# Altium PCB PCB1.PcbDoc
Units mm, origin at the board's own origin, x right, y up, seen from the top; angles counter-clockwise.
Board outline 86.11 x 74.3 mm, 2 copper layers (Top Layer, Bottom Layer); 15 components, 18 nets, 78 pads, 0 vias.
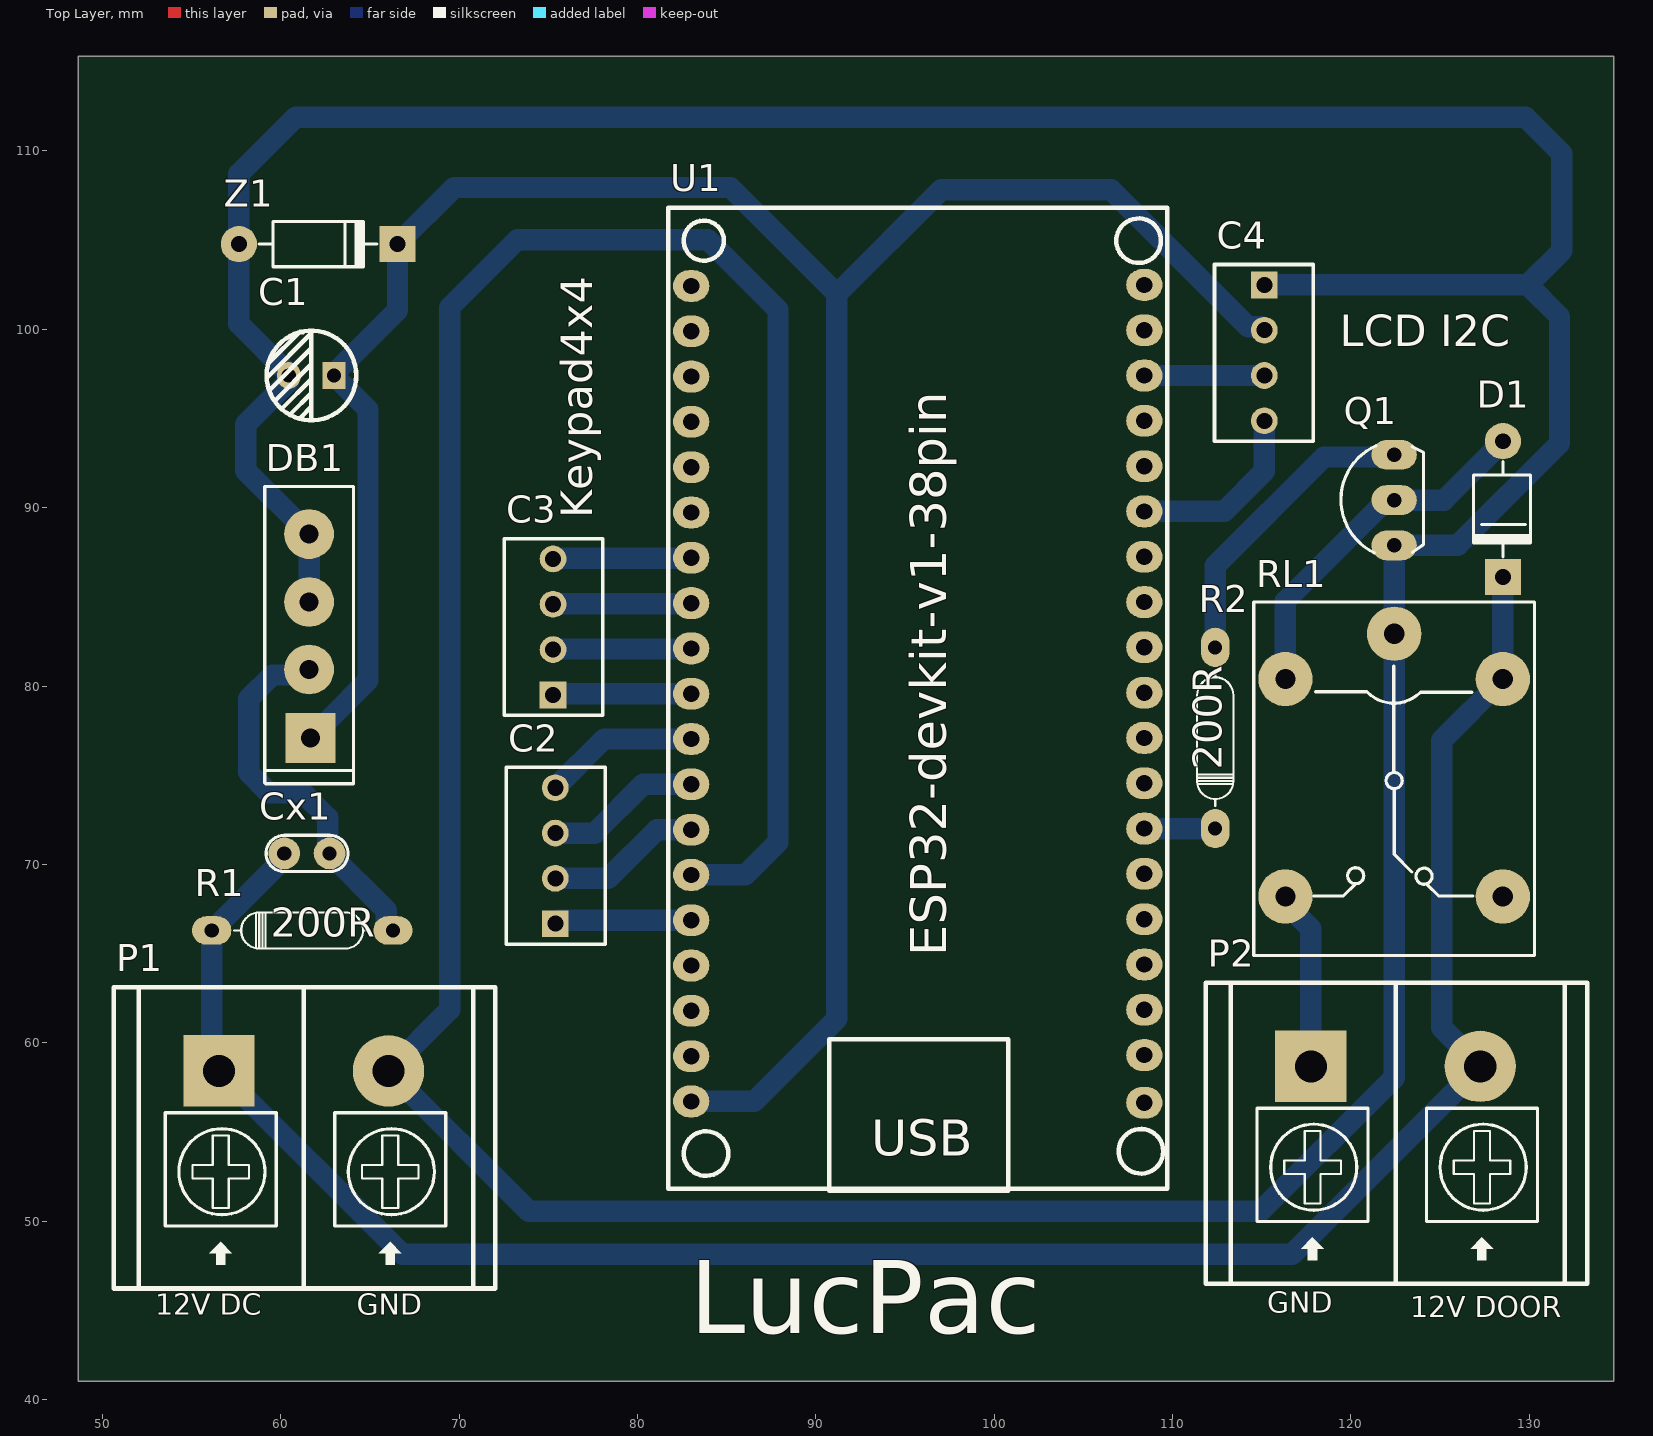
[diagram p0: Top Layer view]
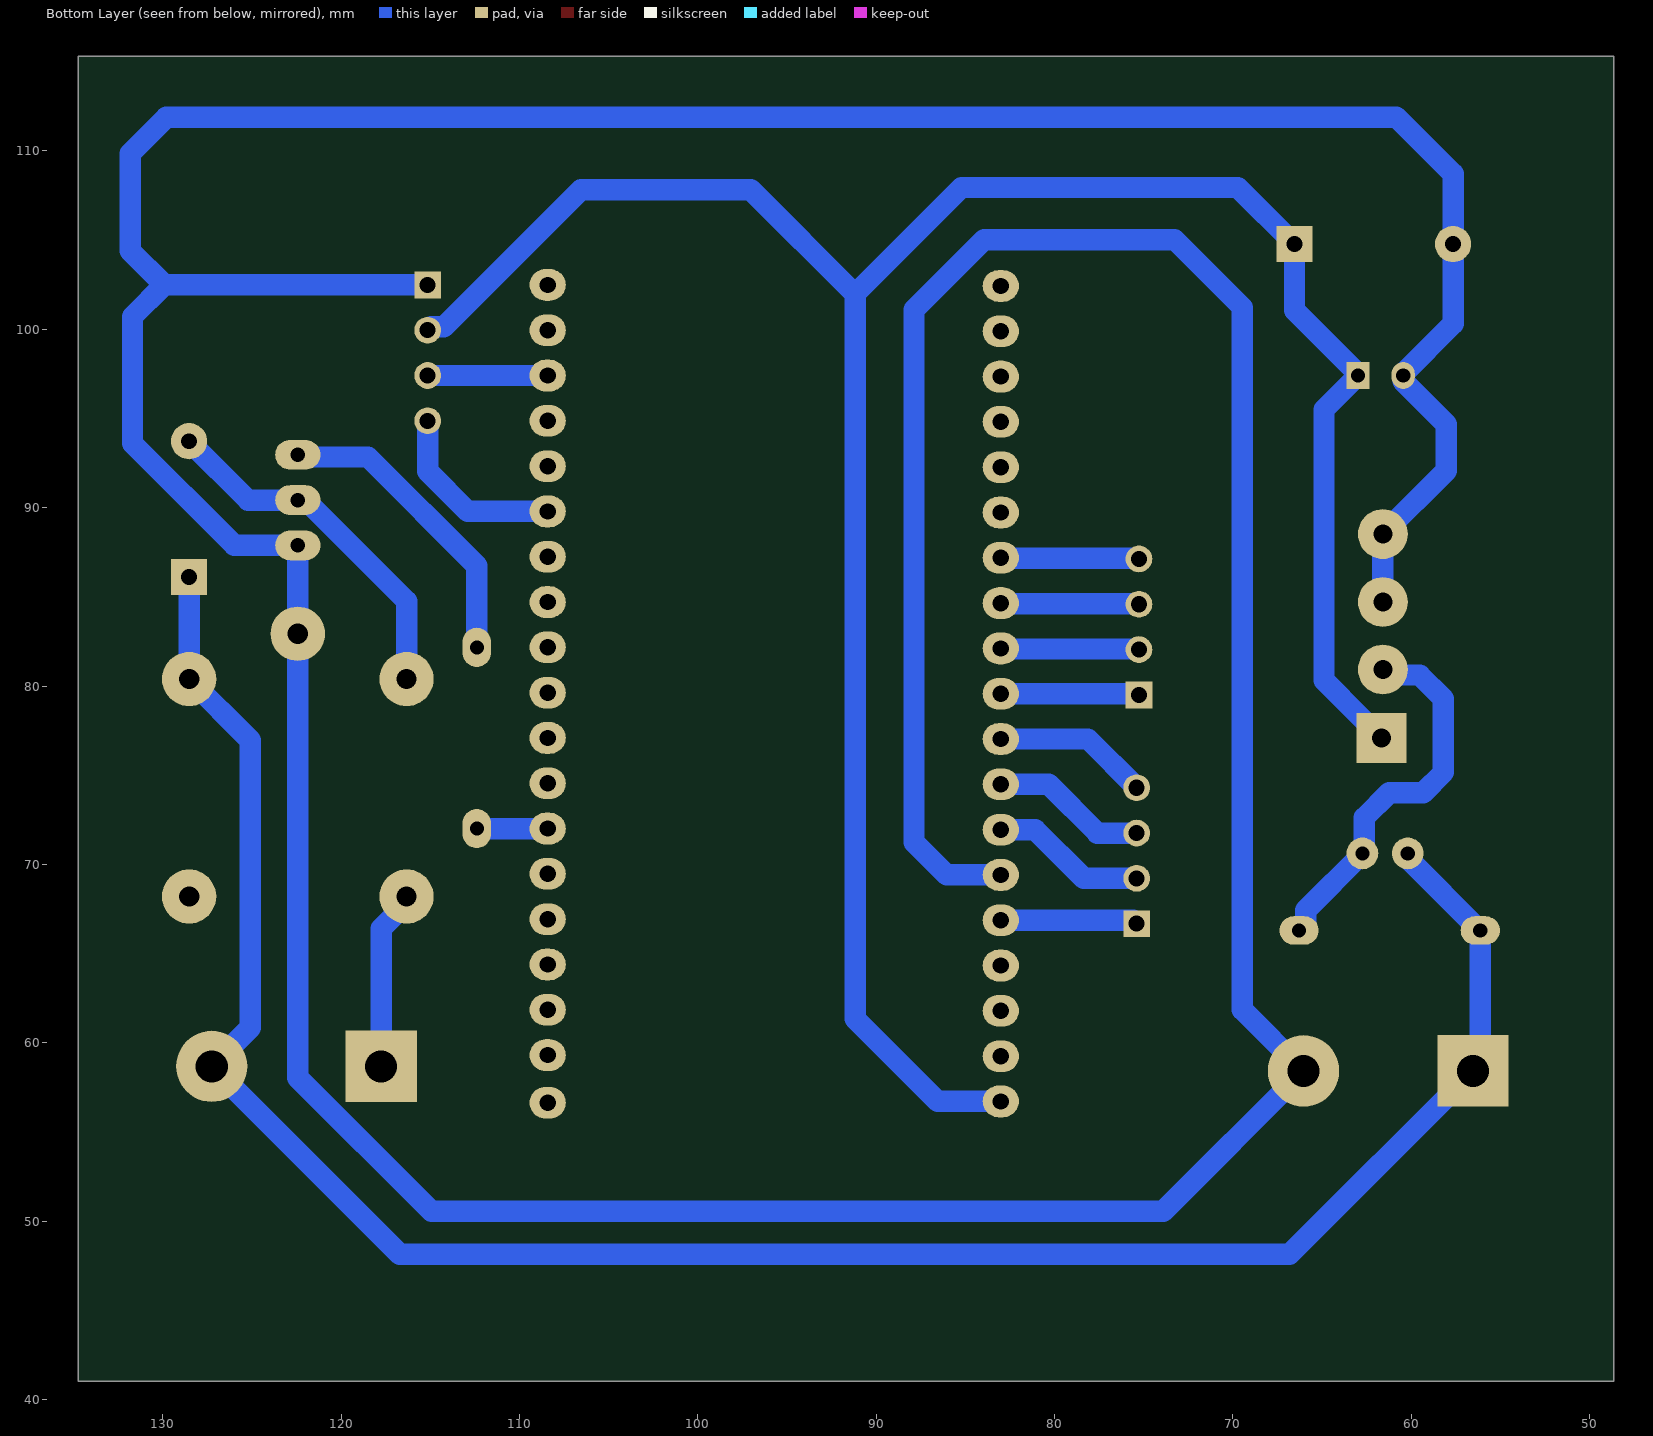
[diagram p1: Bottom Layer view, seen from below]
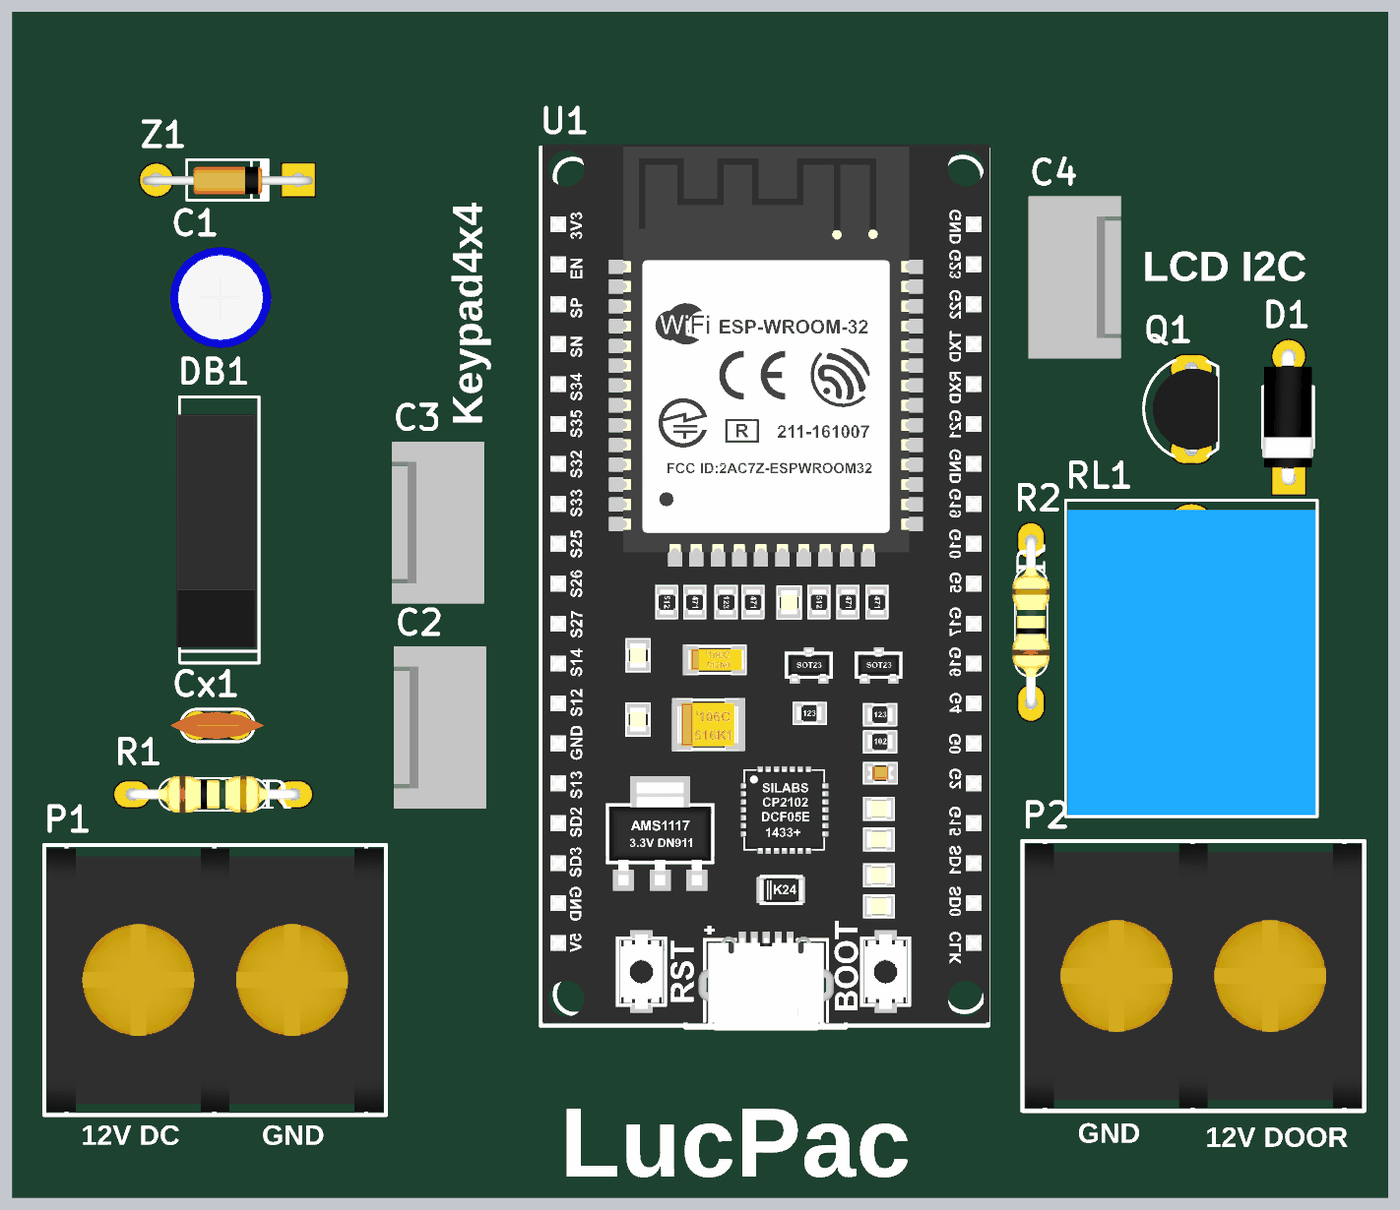
[diagram p2: 3D render of the assembled board from above, using the file's embedded part models]

## Layer stack, top to bottom
Top Solder: solder mask 0.0102, Solder Resist, Dk 3.5
Top Layer: signal copper 0.0356
Dielectric 1: dielectric 0.32, FR-4, Dk 4.8
Bottom Layer: signal copper 0.0356
Bottom Solder: solder mask 0.0102, Solder Resist, Dk 3.5

## Board outline
48.641,41.021 134.747,41.021 134.747,115.316 48.641,115.316

## Design rules (kind name [scope] priority, off if disabled: settings)
Clearance [All] p1: gap=0.31 ignorepadtopadclearanceinfootprint=FALSE
PolygonConnect [All] p1: connectstyle=Relief reliefconductorwidth=0.254 reliefentries=4 polygonreliefangle="90 Angle" airgapwidth=0.254
RoutingVias [All] p1: holewidth=0.711 width=1.27 viastyle="Through Hole" minholewidth=0.711 minwidth=1.27 maxholewidth=0.711 maxwidth=1.27
SilkToSilkClearance [All] p1: silktosilkclearance=0
SilkToSolderMaskClearance [IsPad] p1: minsilkscreentomaskgap=0 clearancetoexposedcopper=TRUE
SolderMaskExpansion [All] p1: expansion=0.102 istentingtop=FALSE
Width [All] p1: maxlimit=5 minlimit=0.254 preferedwidth=0.5
28 further rules are at their usual default settings.

## Components (designator, comment, footprint, x,y, rotation, side; value= is the part's Value field where it differs from the comment)
C1 "100uF" "tu hoa 5mm" 61.722,97.409 r180 top
C2 "Header4" HDR4 75.397,66.675 r90 top
C3 "Header4" HDR4 75.27,79.502 r90 top
C4 "Header4" HDR4 115.148,102.489 r270 top
Cx1 "1uF" CN1 61.468,70.612 r0 top value=33pF
D1 "100v" "DIODE 1A" 128.524,94.996 r90 top
DB1 "Diode Brideg" "CAU 1A" 61.62,77.089 r90 top value="Cau 1A"
P1 "HB9500-2P" HB9500-2P 56.54,58.42 r0 top
P2 "HB9500-2P" HB9500-2P 117.754,58.674 r0 top
Q1 "C1815" TO92 122.428,90.424 r90 top value=C9014
R1 "100K" "DIEN TRO 1/4 W" 56.134,66.294 r0 top value=R
R2 "510" "DIEN TRO 1/4 W" 112.395,72.009 r90 top value=R
RL1 "Relay 10A/12V" "RELAY 5" 122.428,74.676 r270 top value="Relay SPDT, 10A, 12V"
U1 "ESP32-DEVKI-V1.0-PIN38" ESP32-DEVKIT-V1.0-38PIN 95.717,79.248 r0 top
Z1 "5.1V" D1A 57.658,104.775 r180 top

## Footprints (in the part's own frame and the unit in brackets; to place one, negate y for a bottom-side part, rotate by r counter-clockwise, add the part's x,y. Pads: shape width x height; smd on the part's side, far side on the other; paste and mask are expansions set on the pad)
"CAU 1A" [mil] "CAU 1A DET"
  rect 110x110 hole 42: 1(0,-2)
  round 110 hole 42: 2(151,1) 3(300,1) 4(450,1)
  silkscreen extent -101,-97 555,99, body extent -62,-90 512,107, height 453
CN1 [mil]
  round 70 hole 31: 1(-50,0) 2(50,0)
  silkscreen extent -90,-40 91,40, body extent -115,-33 115,33, height 265
D1A [mil] "Diode 1A, W 100mil, L 350mil"
  round 80 hole 35: 1(0,0)
  rect 80x80 hole 35: 2(-350,0)
  silkscreen extent -305,-50 -45,50, body extent -386,-33 34,36, height 84
"DIEN TRO 1/4 W" [mm]
  oval 2.2x1.6 hole 0.787: 1(0,0) 2(10.16,0)
  silkscreen extent 1.26,-1.02 8.88,1.02, body extent -0.3,-1.16 10.46,1.16, height 2.93
"DIODE 1A" [mil] "Diode 1A"
  round 80 hole 35: 1(-50,0)
  rect 80x80 hole 35: 2(-350,0)
  silkscreen extent -305,-61 -95,65, body extent -366,-61 -34,65, height 122
ESP32-DEVKIT-V1.0-38PIN [mil] "DEVKIT 38 PIN"
  oval 80x70 hole 36: 1(-500,912.59) 2(-500,812.59) 3(-500,712.59) 4(-500,612.59) 5(-500,512.59) 6(-500,412.59) 7(-500,312.59) 8(-500,212.59) 9(-500,112.59) 10(-500,12.59) 11(-500,-87.41) 12(-500,-187.41) 13(-500,-287.41) 14(-500,-387.41) 15(-500,-487.41) 16(-500,-587.41) 17(-500,-687.41) 18(-500,-787.41) 19(-500,-887.41) 20(500,-890.09) 21(500,-785.09) 22(500,-685.09) 23(500,-585.09) 24(500,-485.09) 25(500,-385.09) 26(500,-285.09) 27(500,-185.09) 28(500,-85.09) 29(500,14.91) 30(500,114.91) 31(500,214.91) 32(500,314.91) 33(500,414.91) 34(500,514.91) 35(500,614.91) 36(500,714.91) 37(500,814.91) 38(500,914.91)
  silkscreen extent -551,-1085 551,1085, body extent -547,-1092 555,1092, height 269
HB9500-2P [mm]
  rect 4x4 hole 1.8: 1(0,0)
  round 4 hole 1.8: 2(9.5,0)
  silkscreen extent -5.9,-12.2 15.49,4.7, body extent -5.72,-12 15.32,4.5, height 18.51
HDR4 [mm] "Connector; Header; 4 Position"
  rect 1.5x1.5 hole 0.9: 1(0,0)
  round 1.5 hole 0.9: 2(2.54,0) 3(5.08,0) 4(7.62,0)
  silkscreen extent -1.14,-2.79 8.76,2.74, body extent -1.27,-2.92 8.89,2.88, height 11.72
"RELAY 5" [mil] "Reley DPDT, 8 pin, 1A, W400mil, L800mil,H 300mil"
  round 120 hole 45: 1(-325,0) 2(255,240) 3(255,-240) 4(-225,-240) 5(-225,240)
  silkscreen extent -395,-310 385,310, body extent -371,-304 381,306, height 602
TO92 [mil] "TO-92"
  oval 66x100 hole 32: 1(-100,0) 2(0,0) 3(100,0)
  silkscreen extent -117,-65 120,118, body extent -109,-66 109,95, height 245
"tu hoa 5mm" [mm]
  rect 1.3x1.5 hole 0.8: 1(-1.27,0)
  oval 1.3x1.5 hole 0.8: 2(1.27,0)
  silkscreen extent -2.51,-2.51 2.51,2.51, body extent -3.12,-3.18 3.23,3.18, height 14.55

## Part data
C1: library part "Tu Hoa 100uF 16V 5x7", "Cắm", Chung_Loai=Cắm, Don_Vi=Con, Ma_Hang=MH001347, So_Chan=2, Ten_Linh_Kien="Tụ Hóa 100uF 16V 5x7MM"
C2 C3 C4: "Header IDC, 4 x 1 Pin Vertical 2.54mm Pitch (Non-Boxed, Male)", Manufacturer="W¨¹rth Elektronik eiSos GmbH", partNo=613002143121, ComponentLink1 Description=Manufacturer, ComponentLink1URL=http://www.we-online.com, ComponentLink2 Description=Datasheet, ComponentLink2URL=http://katalog.we-online.de/em/datasheet/6130xx143121.pdf, Created by="Karrer Zheng", Created Date="29 March 2013", NoPins=02
Cx1: library part CAP-DIP, "Cremic For Xtal 1pF => 100pF"
D1: library part "Diode 1N4007", "Cắm", Chung_Loai=Cắm, Don_Vi=Con, Ma_Hang=MH001063, Ten_Linh_Kien="Diode 1N4007 1A (DIP)"
DB1: library part DB, "Convert AC to DC voltage, 4 pin"
P1 P2: "Terminal Block, Header, 2P, 15A, 300VAC Rohs Compliant: Yes"
Q1: library part "Trans C1815 DIP", "NPN transistor"
R1 R2: library part "Res 1/4 W", "Resistor", LatestRevisionDate=17-Jul-2002, LatestRevisionNote="Re-released for DXP Platform.", PackageReference=AXIAL-0.4, Published=8-Jun-2000, Publisher="Altium Limited"
RL1: library part "Relay 5", "Relay SPDT,10A - 12VDC 5 Pin"
Z1: library part "Diode Zener", "Diode  Zener"

## Nets (pads, with @x,y where several pads share a name; then routed paths per layer and width w, separated by ;. In a path a pad name is that pad's centre, name@x,y a point inside that pad or via, vN(x,y) a via of type N, cw(c..) or ccw(c..) an arc to the next point about the centre after c; other vN are vias at no path point)
5V: C1.1 C4.2 DB1.1 U1.19 Z1.2 | length 140.1
  Bottom Layer w1.2: DB1.1 62.818,78.236 64.897,80.315 64.897,95.504 C1.1 62.992,97.509 66.548,101.065 Z1.2 69.723,107.95 85.217,107.95 91.186,101.981 ; U1.19 86.553,56.708 91.186,61.341 91.186,101.981 ; C4.2 114.957,100.14 114.236,100.14 106.553,107.823 97.028,107.823 91.186,101.981
12V: Cx1.1 D1.2 P1.1 P2.2 R1.1 RL1.5 | length 123.1
  Bottom Layer w1.2: Cx1.1 60.198,70.335 56.157,66.294 R1.1 56.134,58.826 P1.1 66.827,48.133 116.713,48.133 P2.2 125.095,60.833 125.095,76.962 RL1.5 D1.2
C0: C3.1 U1.10 | length 7.8
  Bottom Layer w1.2: C3.1 75.336,79.568 U1.10
C1: C3.2 U1.9 | length 7.8
  Bottom Layer w1.2: C3.2 75.303,82.075 82.984,82.075 U1.9
C2: C3.3 U1.8 | length 7.8
  Bottom Layer w1.2: C3.3 75.303,84.615 82.984,84.615 U1.8
C3: C3.4 U1.7 | length 7.8
  Bottom Layer w1.2: C3.4 75.303,87.155 82.984,87.155 U1.7
DOOR: R2.1 U1.26 | length 4
  Bottom Layer w1.2: U1.26 108.418,72.008 R2.1 R2.1
GND: C1.2 C4.1 DB1.3 DB1.4 P1.2 Q1.1 RL1.1 U1.14 Z1.1 | length 342.1
  Bottom Layer w1.2: DB1.3 DB1.4 58.039,92.075 58.039,94.68 60.452,97.093 C1.2 60.452,97.509 57.658,100.303 Z1.1 57.658,108.712 60.833,111.887 129.794,111.887 131.826,109.855 131.826,104.394 129.921,102.489 ; U1.14 86.045,69.408 87.884,71.247 87.884,101.092 83.947,105.029 73.279,105.029 69.469,101.219 69.469,61.849 P1.2 73.914,50.546 114.935,50.546 122.428,58.039 RL1.1 Q1.1 125.984,87.884 131.699,93.599 131.699,100.711 129.921,102.489 ; C4.1 129.921,102.489
NetCx1_2: Cx1.2 DB1.2 R1.2 | length 21.6
  Bottom Layer w1.2: DB1.2 61.29,80.619 59.537,80.619 58.199,79.281 58.199,75.155 59.334,74.02 61.235,74.02 62.627,72.628 62.627,70.723 Cx1.2 65.917,67.433 65.917,66.479 66.102,66.294 R1.2
NetD1_1: D1.1 Q1.2 RL1.4 | length 20.3
  Bottom Layer w1.2: RL1.4 116.332,84.76 121.996,90.424 Q1.2 125.222,90.424 D1.1
NetP2_1: P2.1 RL1.3 | length 10.1
  Bottom Layer w1.2: RL1.3 116.332,67.827 117.754,66.405 P2.1
NetQ1_3: Q1.3 R2.2 | length 17.2
  Bottom Layer w1.2: R2.2 112.395,86.741 118.491,92.837 122.301,92.837 Q1.3
R0: C2.1 U1.15 | length 7.7
  Bottom Layer w1.2: C2.1 75.59,66.868 U1.15
R1: C2.2 U1.13 | length 8.8
  Bottom Layer w1.2: C2.2 78.359,69.215 81.092,71.948 U1.13
R2: C2.3 U1.12 | length 8.8
  Bottom Layer w1.2: C2.3 77.597,71.755 80.33,74.488 U1.12
R3: C2.4 U1.11 | length 8.8
  Bottom Layer w1.2: C2.4 78.13,77.028 U1.11
SCL: C4.3 U1.36 | length 6.7
  Bottom Layer w1.2: U1.36 108.418,97.408 115.147,97.408 C4.3
SDA: C4.4 U1.33 | length 10.5
  Bottom Layer w1.2: U1.33 112.901,89.787 115.148,92.034 C4.4
pads on no net: RL1.2 U1.1 U1.2 U1.3 U1.4 U1.5 U1.6 U1.16 U1.17 U1.18 U1.20 U1.21 U1.22 U1.23 U1.24 U1.25 U1.27 U1.28 U1.29 U1.30 U1.31 U1.32 U1.34 U1.35 U1.37 U1.38

## Silkscreen, mask and mechanical layers (free items; w line width, h text height)
Top Overlay:
  text "LCD I2C" at 119.38,98.458 h3
  text "Keypad4x4" at 78.047,89.408 h3 r90
  text "GND" at 115.316,44.474 h2
  text "12V DC" at 52.959,44.345 h2
  text "GND" at 64.262,44.347 h2
  text "12V DOOR" at 123.317,44.22 h2
  text "LucPac" at 82.931,42.362 h7

## Text inside footprints (layer, text, board x,y; h text height)
R1: Top Overlay "200R" at 59.436,65.405 h2.8
R2: Top Overlay "200R" at 113.284,75.311 h2.8 r90
U1: Top Overlay "USB" at 93.117,53.66 h2.03; Top Overlay "ESP32-devkit-v1-38pin" at 97.308,64.836 h2.03 r90